# Altium PCB Power supply.PcbDoc
Units mm, origin at the board's own origin, x right, y up, seen from the top; angles counter-clockwise.
Board outline 70 x 30 mm, 2 copper layers (Top Layer, Bottom Layer); 11 components, 6 nets, 30 pads, 21 vias.
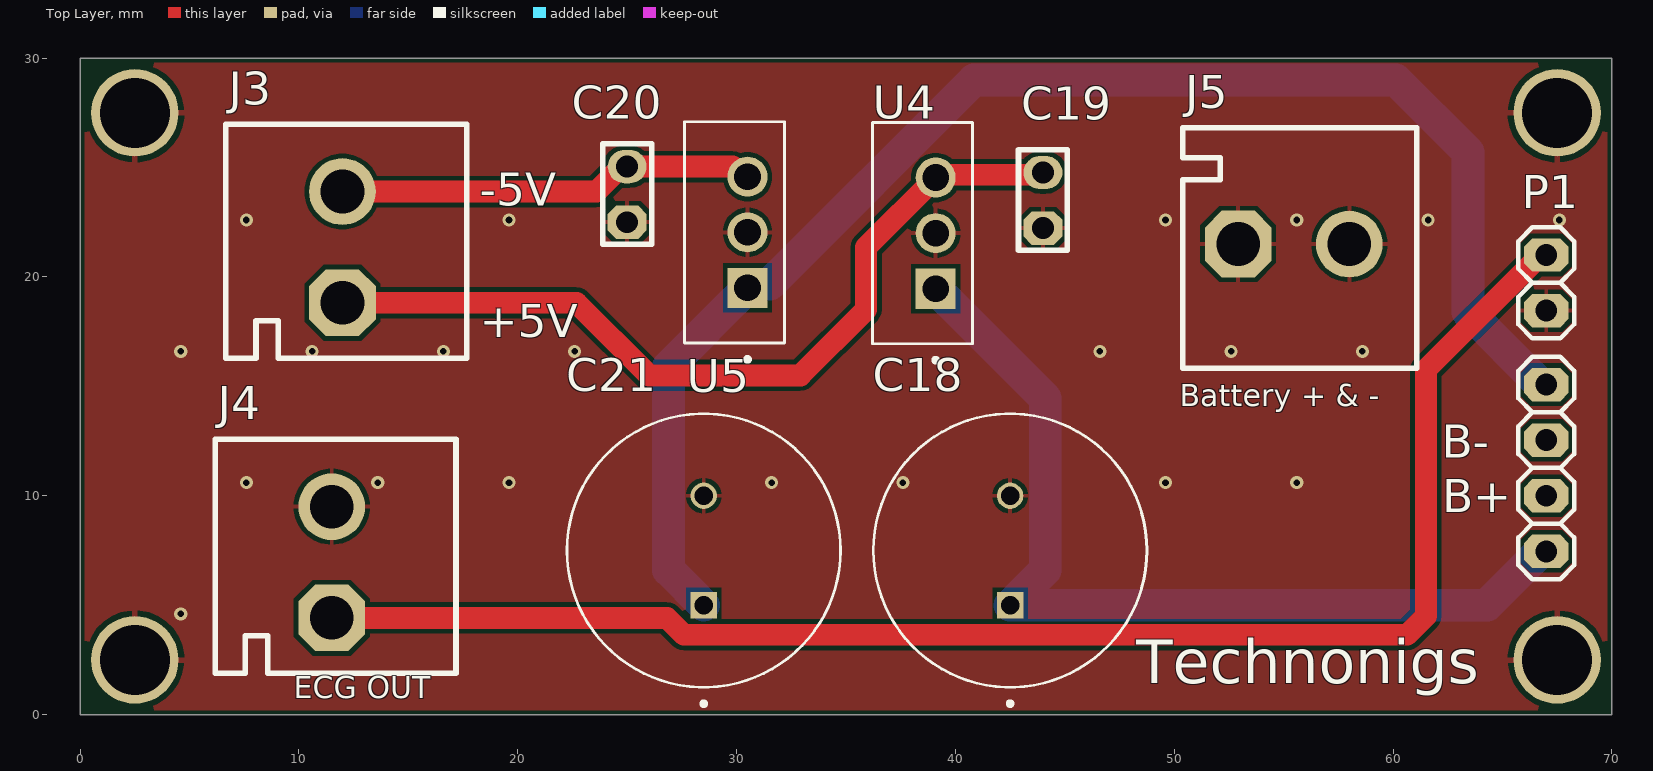
[diagram p0: Top Layer view]
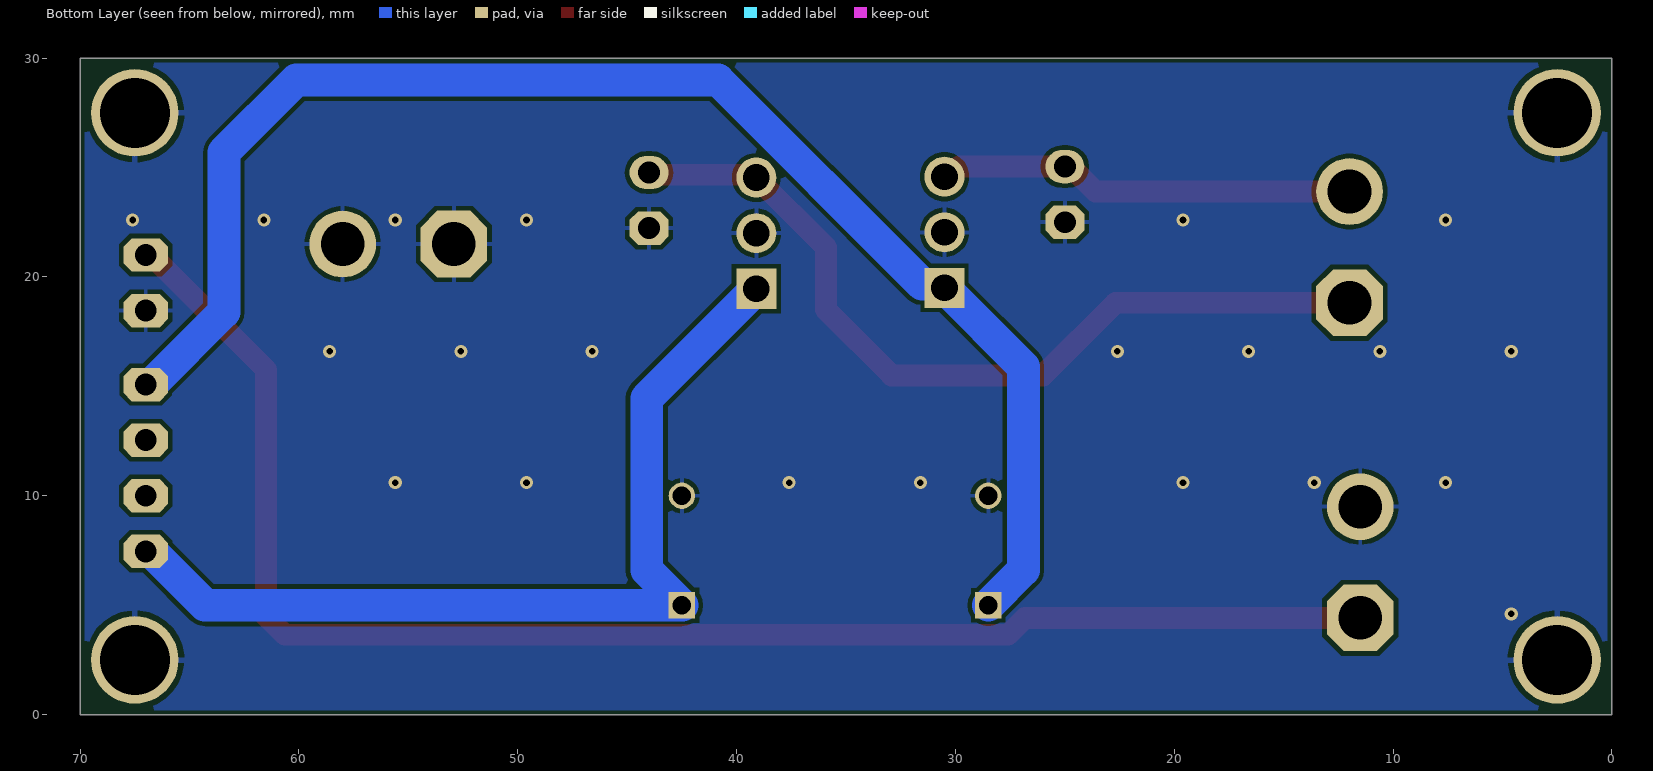
[diagram p1: Bottom Layer view, seen from below]
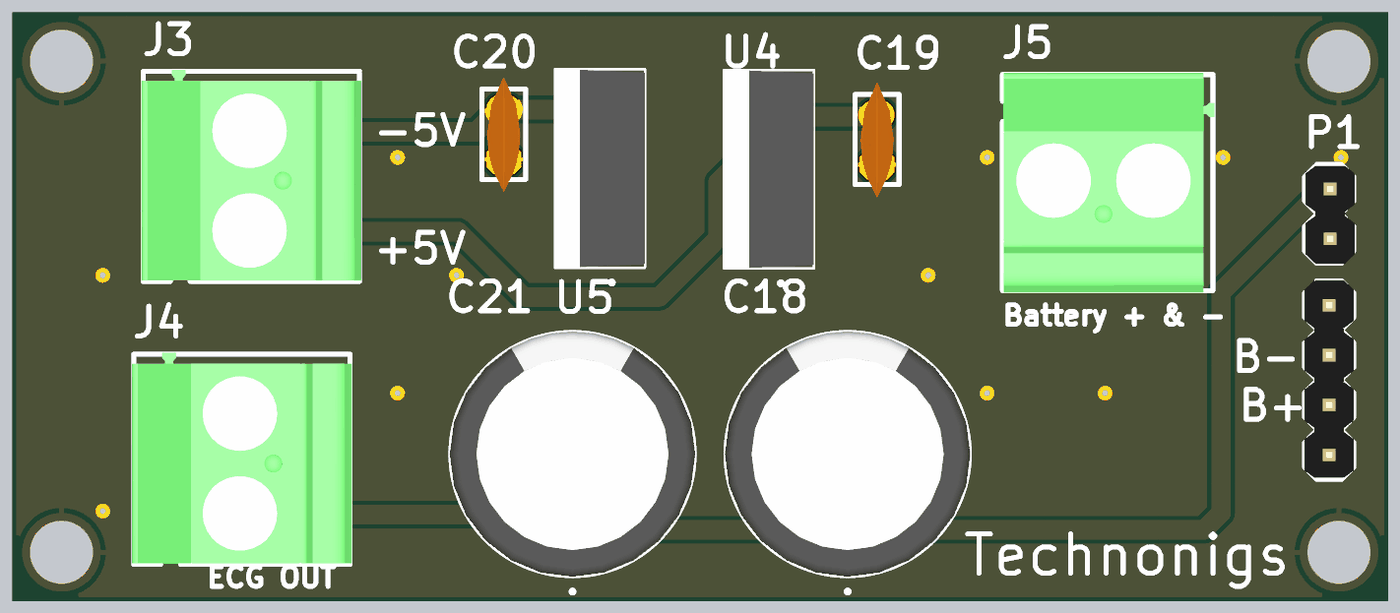
[diagram p2: 3D render of the assembled board from above, using the file's embedded part models]

## Layer stack, top to bottom
Top Solder: solder mask 0.0102, Solder Resist, Dk 3.5
Top Layer: signal copper 0.0356
Dielectric 1: dielectric 0.32, FR-4, Dk 4.8
Bottom Layer: signal copper 0.0356
Bottom Solder: solder mask 0.0102, Solder Resist, Dk 3.5

## Board outline
0,0 70,0 70,30 0,30

## Design rules (kind name [scope] priority, off if disabled: settings)
BoardOutlineClearance [All] p1: gap=0.2 ignorepadtopadclearanceinfootprint=FALSE
Clearance [All] p1: gap=0.203 ignorepadtopadclearanceinfootprint=FALSE except(0.25: Arc-Hole Track-Hole SMDPad-Hole THPad-Hole Via-Hole Fill-Hole Poly-Hole Region-Hole Text-Hole)
ComponentClearance [All] p1: gap=0.127 collisioncheckmode=3 verticalgap=0.127 showdistances=TRUE
DiffPairsRouting [All] p1: maxlimit=0.381 minlimit=0.203 mostfreqgap=0.203 toplayer_minwidth=0.203 toplayer_maxwidth=25.4 toplayer_prefwidth=0.203 bottomlayer_minwidth=0.203 bottomlayer_maxwidth=25.4 bottomlayer_prefwidth=0.203 maxuncoupledlength=12.7
Height [All] p1: minheight=0 maxheight=1816.048 prefheight=12.7
HoleSize [All] p1: absolutevalues=TRUE maxlimit=6.3 minlimit=0.3 maxpercent=80.000 minpercent=20.000
HoleToHoleClearance [All] p1: gap=0.25 allowstackedmicrovias=FALSE
MinimumAnnularRing [All] p1: minimumring=0.076
MinimumSolderMaskSliver [All] p1: minsoldermaskwidth=0
PlaneClearance [All] p1: clearance=0.203
PlaneConnect PlaneConnectPowerPads [InPadClass('PowerPads')] p1: planeconnectstyle=Direct reliefexpansion=0.508 reliefentries=4 reliefconductorwidth=0.254 reliefairgap=0.254
PlaneConnect [All] p2: pad.planeconnectstyle=Relief pad.reliefexpansion=0.3 pad.reliefentries=4 pad.reliefconductorwidth=0.203 pad.reliefairgap=0.203 via.planeconnectstyle=Direct via.reliefexpansion=0.3 via.reliefentries=4 via.reliefconductorwidth=0.127 via.reliefairgap=0.127
PolygonConnect PolygonConnectPowerPads [All vs (InPadClass('PowerPads'))] p1: connectstyle=Direct reliefconductorwidth=0.254 reliefentries=4 polygonreliefangle="90 Angle" airgapwidth=0.254
PolygonConnect [All] p2: thpad.connectstyle=Relief thpad.reliefconductorwidth=0.203 thpad.reliefentries=4 thpad.polygonreliefangle="90 Angle" thpad.airgapwidth=0.203 smdpad.connectstyle=Relief smdpad.reliefconductorwidth=0.203 smdpad.reliefentries=4 smdpad.polygonreliefangle="90 Angle" smdpad.airgapwidth=0.203 via.connectstyle=Direct via.reliefconductorwidth=0.127 via.reliefentries=4 via.polygonreliefangle="90 Angle" via.airgapwidth=0.127
RoutingVias [All] p1: holewidth=0.3 width=0.6 viastyle="Through Hole" minholewidth=0.3 minwidth=0.6 maxholewidth=0.6 maxwidth=6.6
SilkToSilkClearance [All] p1: silktosilkclearance=0
SilkToSolderMaskClearance [IsPad] p1: minsilkscreentomaskgap=0.127 clearancetoexposedcopper=TRUE
SolderMaskExpansion [All] p1: expansion=0.075 istentingtop=FALSE
Width [All] p1: maxlimit=25.4 minlimit=0.203 preferedwidth=0.203 minimp=50.000000 maximp=50.000000 favimp=50.000000
20 further rules are at their usual default settings.

## Classes and differential pairs
component class "Power supply": B- C19 C20 J3 J4 J5 P1 U4 U5

## Components (designator, comment, footprint, x,y, rotation, side; value= is the part's Value field where it differs from the comment)
B- "To Switches" My_1X04 67,11.27 r270 top (schematic designator P2)
C18 "10uF" "10uF capacitor" 42.5,7.5 r90 top
C19 "100nF" "100nF capacitor" 44,23.5 r90 top
C20 "100nF" "100nF capacitor" 25,23.77 r90 top
C21 "10uF" "10uF capacitor" 28.5,7.5 r90 top
J3 "Power out" My_CN2 12,21.5 r90 top
J4 "Power out" My_CN2 11.513,7.1 r90 top
J5 "Battery + & -" My_CN2 55.6,21.487 r0 top
P1 "To Oscilloscope" My_1X02 67,21 r90 top
U4 "LM7805T" TO254P1011X457X1950-3 38.5,22 r90 top
U5 "LM7905T" TO254P1011X457X1950-3 29.9,22.04 r90 top

## Footprints (in the part's own frame and the unit in brackets; to place one, negate y for a bottom-side part, rotate by r counter-clockwise, add the part's x,y. Pads: shape width x height; smd on the part's side, far side on the other; paste and mask are expansions set on the pad)
"10uF capacitor" [mm]
  round 1.2 hole 0.85: N(2.5,0)
  rect 1.2x1.2 hole 0.85: P(-2.5,0)
  silkscreen extent -7.1,-6.25 6.25,6.25, body extent -6.25,-6.25 6.25,6.25, height 20
"100nF capacitor" [mil]
  oct 60x70 hole 39.37: 1(-50,0)
  oval 60x70 hole 39.37: 2(50,0)
  silkscreen extent -90,-44 91,44, body extent -115,-33 115,33, height 245
My_1X02 [mil]
  oct 60x80 hole 39.37: 1(-100,0) 2(0,0)
  silkscreen extent -150,-50 50,50, body extent -150,-51 46,47, height 323
My_1X04 [mil]
  oct 60x80 hole 39.37: 1(-150,0) 2(-50,0) 3(50,0) 4(150,0)
  silkscreen extent -200,-50 200,50, body extent -200,-49 196,49, height 323
My_CN2 [mil]
  oct 120x120 hole 78.74: 1(-105.5,0.5)
  round 120 hole 78.74: 2(94.5,0.5)
  silkscreen extent -206,-223 216,210, body extent -203,-227 219,214, height 721
TO254P1011X457X1950-3 [mm]
  rect 1.83x1.83 / inner round 1.83 / far side rect 1.83x1.83 hole 1.22 mask+0.102: 1(-2.54,-0.6)
  round 1.83 hole 1.22 mask+0.102: 2(0,-0.6) 3(2.54,-0.6)
  silkscreen extent -5.9,-2.28 5.05,2.28, body extent -5.08,-2.28 5.08,2.28, height 19.5

## Part data
B-: library part "Header 4", "Header, 4-Pin", ASiD Part Number="Header 4-AS"
C18 C21: library part "10uF capacitor"
J3 J4 J5: library part "2 terminal block", "Conn Eurostyle Block 2 POS 5.08mm Solder ST Thru-Hole 15A/Contact Eurostyleâ„¢", Package=None, Check_prices=https://www.snapeda.com/parts/395943002/Molex/view-part/?ref=eda, MF=Molex, MP=395943002, SnapEDA_Link=https://www.snapeda.com/parts/395943002/Molex/view-part/?ref=snap
P1: library part "Header 2", "Header, 2-Pin", ASiD Part Number="Header 2-AS"
U4: "3-Terminal 1.5A Positive Fixed Voltage Regulator", Package="TO-220-3 TAEJIN", Check_prices=https://www.snapeda.com/parts/LM7805T/TAEJIN/view-part/?ref=eda, MF=TAEJIN, MP=LM7805T, SnapEDA_Link=https://www.snapeda.com/parts/LM7805T/TAEJIN/view-part/?ref=snap
U5: library part LM7805T, "3-Terminal 1.5A Positive Fixed Voltage Regulator", Package="TO-220-3 TAEJIN", Check_prices=https://www.snapeda.com/parts/LM7805T/TAEJIN/view-part/?ref=eda, MF=TAEJIN, MP=LM7805T, SnapEDA_Link=https://www.snapeda.com/parts/LM7805T/TAEJIN/view-part/?ref=snap
C19 C20: ComponentLink1Description="New link"

## Free pads (board coordinates)
  round 4 hole 3.2 paste-2539.97 mask+0.102: MH6(2.5,27.5) MH7(2.5,2.5) MH8(67.5,27.5) MH9(67.5,2.5)

## Via types
v1: diameter 0.6, hole 0.3, Top Layer to Bottom Layer, 21 vias

## Nets (pads, with @x,y where several pads share a name; then routed paths per layer and width w, separated by ;. In a path a pad name is that pad's centre, name@x,y a point inside that pad or via, vN(x,y) a via of type N, cw(c..) or ccw(c..) an arc to the next point about the centre after c; other vN are vias at no path point)
GND: C18.N C19.1 C20.1 C21.N J4.2 J5.1 J5.2 P1.1 pad.MH6 pad.MH7 pad.MH8 pad.MH9 U4.2 U5.2
  other v1: 4.6,4.6 7.6,10.6 13.6,10.6 19.6,10.6 31.6,10.6 37.6,10.6 49.6,10.6 55.6,10.6 4.6,16.6 10.6,16.6 16.6,16.6 22.6,16.6 46.6,16.6 52.6,16.6 58.6,16.6 7.6,22.6 19.6,22.6 49.6,22.6 55.6,22.6 61.6,22.6 67.6,22.6
In-: B-.1 C21.P U5.1 | length 67.1
  Bottom Layer w1.5: C21.P 26.896,6.604 26.896,15.896 U5.1 30.665,19.665 31.511,19.665 40.846,29 60.121,29 63.428,25.694 63.428,18.398 66.746,15.08 B-.1
NetC18_P: B-.4 C18.P U4.1 | length 42.7
  Bottom Layer w1.5: U4.1 44.104,14.456 44.104,6.604 C18.P 64.286,5 66.746,7.46 B-.4
NetC19_2: C19.2 J3.1 U4.3 | length 38.9
  Top Layer w1: J3.1 22.68,18.82 26,15.5 32.914,15.5 35.916,18.502 35.916,21.356 U4.3 39.23,24.67 43.9,24.67 C19.2
NetC20_2: C20.2 J3.2 U5.3 | length 19.2
  Top Layer w1: J3.2 23.592,23.9 24.731,25.04 C20.2 29.815,25.04 30.275,24.58 U5.3
NetJ4_1: J4.1 P1.2 | length 69.6
  Top Layer w1: J4.1 26.814,4.42 27.588,3.646 60.646,3.646 61.5,4.5 61.5,15.754 66.746,21 P1.2
pads on no net: B-.2 B-.3

## Polygon pours and split planes (outlines as drawn)
GND on Top Layer "GND_L01_P001" (solid, pour order 1): 0,30 0,0 70,0 70,30
GND on Bottom Layer "GND_L02_P000" (solid, pour order 0): 0,30 70,30 70,0 0,0

## Silkscreen, mask and mechanical layers (free items; w line width, h text height)
Top Overlay:
  text "-5V" at 18.254,23.254 h1.52
  text "+5V" at 18.254,17.254 h1.52
  text "Battery + & -" at 50.254,14.087 h1
  text "B+" at 62.254,9.254 h1.52
  text "Technonigs" at 48.254,1.421 h2
  text "ECG OUT" at 9.754,0.754 h1